# Altium PCB FMUM.PcbDoc (part 3 of 4)
Units mm, origin at the board's own origin, x right, y up, seen from the top; angles counter-clockwise.
Board outline 36 x 29 mm, 8 copper layers (Top Layer, GND1, Signal1, GND2, PWR1, Signal2, GND3, Bottom Layer), stack 1.01 mm thick; 117 components, 167 nets, 719 pads, 811 vias.
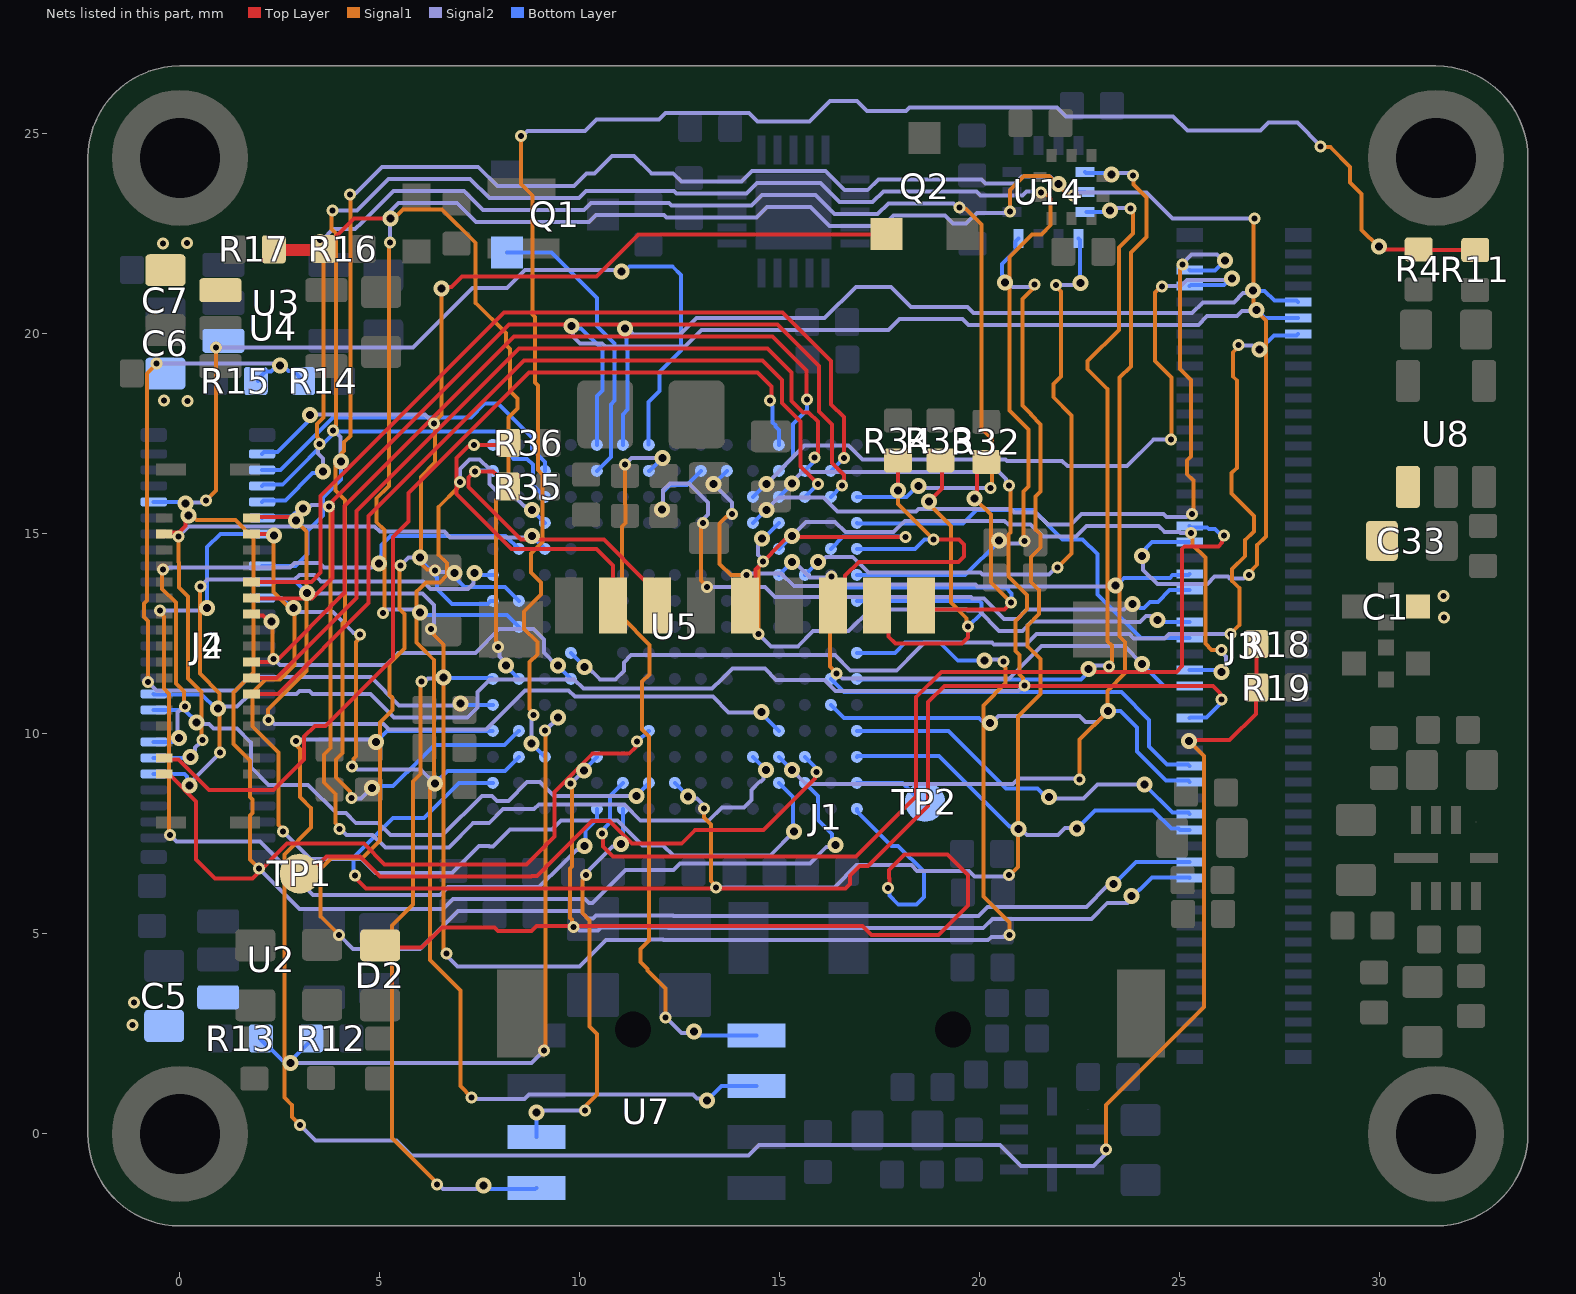
[diagram p9: the nets of this part, all layers, seen from the top]

## Via types
v1: diameter 0.3, hole 0.15, Top Layer to Bottom Layer, tented both sides, 279 vias
v2: diameter 0.3, hole 0.15, Signal1 to Signal2, tented both sides, 267 vias
v3: diameter 0.4, hole 0.2, Signal2 to Bottom Layer, tented both sides, 209 vias
v4: diameter 0.4, hole 0.2, Top Layer to Signal1, tented both sides, 54 vias
v5: diameter 0.3, hole 0.15, Top Layer to Bottom Layer, tented top, 2 vias

## Nets (pads, with @x,y where several pads share a name; then routed paths per layer and width w, separated by ;. In a path a pad name is that pad's centre, name@x,y a point inside that pad or via, vN(x,y) a via of type N, cw(c..) or ccw(c..) an arc to the next point about the centre after c; other vN are vias at no path point) (continued)
nLED_RED: D2.K U5.A1 | length 23.2
  Top Layer w0.1: D2.K@5.004,4.714 5.063,4.655 6.041,4.655 6.547,5.16 7.865,5.16 7.951,5.074 8.784,5.074 8.91,5.2 17.063,5.2 17.287,4.976 18.959,4.976 19.699,5.716 19.699,6.476 19.194,6.98 18.11,6.98 17.724,6.594 17.724,6.4 17.734,6.39 17.734,6.185 v1(17.698,6.149)
  Bottom Layer w0.1: U5.A1@16.923,8.127 16.923,8.072 17.007,7.988 17.007,7.986 17.792,7.201 17.956,7.201 18.599,6.558 18.599,5.927 18.412,5.741 17.958,5.741 17.736,5.963 17.736,6.111 v1(17.698,6.149)
nPOWER_IN_A: J3.89 U5.M7 | length 27.5
  Signal1 w0.1: v2(26.261,12.5) 26.484,12.722 26.484,13.646 26.3,13.829 26.3,14.118 26.633,14.451 26.633,14.843 26.852,15.062 26.852,15.452 26.289,16.015 26.289,16.52 26.421,16.652 26.421,18.842 26.321,18.942 26.321,19.531 26.47,19.68 v2(26.47,19.725)
  Signal2 w0.1: v3(10.111,11.673) 10.19,11.673 10.496,11.367 10.891,11.367 11.096,11.572 11.096,11.783 11.28,11.967 16.377,11.967 16.765,11.579 17.914,11.579 18.465,12.131 18.614,12.279 20.305,12.279 20.347,12.237 21.156,12.237 21.417,12.498 23.734,12.498 23.843,12.389 24.617,12.389 24.728,12.5 v2(26.261,12.5) ; v2(26.47,19.725) 26.479,19.715 26.812,19.715 26.914,19.613 v3(26.995,19.613)
  Bottom Layer w0.1: U5.M7@9.773,12.027 10.111,11.688 v3(10.111,11.673) ; v3(26.995,19.613) 27.348,19.965 27.92,19.965 J3.89@27.955,20
nPOWER_IN_B: J3.91 U5.L15 | length 22.5
  Signal2 w0.1: v3(9.788,20.194) 9.829,20.152 9.829,19.94 10.004,19.765 10.552,19.765 10.634,19.683 12.627,19.683 13.037,20.093 17.712,20.093 17.993,20.374 19.566,20.374 19.716,20.225 25.459,20.225 25.679,20.445 26.426,20.445 26.55,20.569 26.887,20.569 v3(26.913,20.595)
  Bottom Layer w0.1: v3(9.788,20.194) 9.841,20.14 10.029,20.14 10.559,19.61 10.559,19 10.559,18.584 10.423,18.448 U5.L15@10.423,17.227 ; v3(26.913,20.595) 26.926,20.595 27.122,20.399 J3.91@27.955,20.4 J3.91@27.955,20.4
nPOWER_IN_C: J3.93 U5.K15 | length 21
  Signal2 w0.1: v3(11.125,20.133) 11.184,20.133 11.334,19.983 12.503,19.983 12.913,20.393 16.12,20.393 16.903,21.176 17.778,21.176 18.28,20.674 19.691,20.674 19.84,20.525 25.307,20.525 25.573,20.791 26.348,20.791 26.583,21.026 26.772,21.026 v3(26.829,21.082)
  Bottom Layer w0.1: U5.K15@11.073,17.227 11.073,17.989 11.189,18.105 11.189,19 11.189,19.618 11.166,19.641 11.166,20.092 v3(11.125,20.133) ; v3(26.829,21.082) 26.832,21.079 27.12,21.079 27.364,20.835 27.92,20.835 J3.93@27.955,20.8
PG6: J4.44 U5.J15 | length 22.4
  Signal1 w0.1: v2(0.651,15.838) 0.9,16.087 v2(0.9,19.665)
  Signal2 w0.1: v3(0.144,15.758) 0.17,15.784 0.543,15.784 0.597,15.838 v2(0.651,15.838) ; v2(0.9,19.665) 5.829,19.665 7.316,21.151 8.183,21.151 8.632,21.6 10.996,21.6 v3(11.035,21.561)
  Bottom Layer w0.1: J4.44@-0.655,15.8 0.102,15.8 v3(0.144,15.758) ; v3(11.035,21.561) 11.116,21.561 11.235,21.68 12.32,21.68 12.532,21.468 12.532,19.586 11.989,19.043 11.989,18.568 11.718,18.297 U5.J15@11.718,17.232
SCALED_V5: R18.1 R19.2 U5.R4 | length 51.4
  Top Layer w0.1: v4(25.227,9.825) 25.246,9.844 26.244,9.844 26.897,10.497 26.897,10.899 26.936,10.939 26.913,10.963 R18.1@26.913,12.245
  Signal1 w0.1: v2(2.898,9.817) 2.937,9.779 2.937,9.683 2.998,9.621 2.998,8.427 3.283,8.142 3.283,7.664 2.609,6.991 2.609,0.912 2.805,0.717 2.805,0.422 2.998,0.228 v2(2.998,0.222) ; v2(23.149,-0.39) 23.149,0.724 25.6,3.174 25.6,9.452 v4(25.227,9.825)
  Signal2 w0.1: v2(2.898,9.817) 2.937,9.856 3.047,9.856 3.057,9.866 4.76,9.866 4.822,9.804 v3(4.904,9.804) ; v2(2.998,0.222) 3.385,-0.165 5.415,-0.165 5.791,-0.541 14.209,-0.541 14.473,-0.277 20.498,-0.277 21.022,-0.802 22.839,-0.802 23.111,-0.53 23.111,-0.429 v2(23.149,-0.39)
  Bottom Layer w0.1: v3(4.904,9.804) 5.179,10.079 6,10.079 U5.R4@7.821,10.079
SCALED_VDD_3V3_SENSORS1: R4.1 R11.2 U5.N3 | length 43.5
  Top Layer w0.1: v4(29.979,22.185) 30.06,22.185 30.133,22.113 R4.1@30.968,22.113 ; R4.1@30.969,22.111 30.982,22.098 R11.2@32.383,22.098
  Signal1 w0.1: v2(8.527,24.95) 8.527,23.751 8.815,23.463 8.815,20.49 8.88,20.424 8.88,19 8.88,18.78 8.947,18.713 8.947,16.596 9.068,16.474 9.068,14.793 8.782,14.507 8.782,14.039 9.032,13.789 9.032,13.483 8.605,13.056 8.605,12.627 8.934,12.298 8.934,11.989 8.738,11.793 8.738,10.626 8.842,10.522 v2(8.842,10.467) ; v2(28.515,24.682) 28.531,24.667 28.761,24.667 29.251,24.176 29.251,23.791 29.545,23.497 29.545,22.602 29.962,22.185 v4(29.979,22.185)
  Signal2 w0.1: v2(8.527,24.95) 8.558,24.95 8.686,25.078 10.126,25.078 10.412,25.364 11.983,25.364 12.137,25.518 14.232,25.518 14.44,25.31 15.74,25.31 16.252,25.822 16.928,25.822 17.178,25.572 18.151,25.572 18.243,25.664 21.926,25.664 22.154,25.437 24.832,25.437 25.188,25.081 27.011,25.081 27.211,25.281 27.936,25.281 28.515,24.702 v2(28.515,24.682) ; v3(8.791,9.758) 8.791,10.362 8.842,10.413 v2(8.842,10.467)
  Bottom Layer w0.1: v3(8.791,9.758) U5.N3@9.123,9.427
SCALED_VDD_3V3_SENSORS2: R12.1 R13.2 U5.N4 | length 17.2
  Signal1 w0.1: v2(9.104,2.088) 9.134,2.117 9.134,6.736 v2@9.134,10.081
  Signal2 w0.1: v3(2.767,1.773) 8.788,1.772 v2(9.104,2.088) ; v2(9.132,10.083) 9.447,10.399 v3(9.447,10.415)
  Bottom Layer w0.1: R13.2@2.024,2.388 2.024,2.351 2.272,2.103 2.298,2.103 2.57,1.831 2.709,1.831 v3@2.74,1.8 ; v3(2.767,1.773) 2.767,1.827 3.285,2.345 R12.1@3.285,2.388 ; U5.N4@9.123,10.077 9.447,10.401 v3(9.447,10.415)
SCALED_VDD_3V3_SENSORS3: R14.1 R15.2 U5.R5 | length 21.9
  Signal1 w0.1: v2(-0.801,11.3) -0.801,12.824 -0.901,12.924 -0.901,13.255 -0.824,13.333 -0.824,19.007 -0.585,19.246 v2(-0.585,19.265)
  Signal2 w0.1: v2(-0.801,11.3) v2(-0.801,11.3) -0.581,11.081 1.385,11.081 1.726,11.421 4.774,11.421 5.479,10.716 6,10.716 6.961,10.716 v3(7.01,10.765) ; v2(-0.585,19.265) 2.45,19.265 v3(2.5,19.215)
  Bottom Layer w0.1: R15.2@1.948,18.821 1.948,18.868 2.144,19.064 2.273,19.064 2.462,19.253 v3(2.5,19.215) 2.562,19.215 2.709,19.067 2.836,19.067 R14.1@3.081,18.821 ; v3(7.01,10.765) 7.049,10.727 U5.R5@7.823,10.727
SCALED_VDD_3V3_SENSORS4: R16.1 R17.2 U5.P6 | length 17.6
  Top Layer w0.1: R16.1@3.566,22.1 R16.1@3.589,22.123 4.348,22.882 v4(5.266,22.882)
  Top Layer w0.3: R17.2@2.346,22.1 R16.1@3.566,22.1
  Signal1 w0.1: v4(5.266,22.882) 5.347,22.882 5.574,23.11 6.555,23.11 7.395,22.269 7.395,20.778 8.148,20.026 8.148,19.725 8.248,19.624 8.248,19 8.248,18.574 8.441,18.381 8.441,18.133 8.218,17.911 8.218,16.161 7.908,15.85 7.908,12.328 7.913,12.323 7.913,12.208 v2(7.951,12.17)
  Signal2 w0.1: v2(7.951,12.17) 7.99,12.131 7.99,11.938 8.148,11.78 v3(8.148,11.715)
  Bottom Layer w0.1: v3(8.148,11.715) 8.148,11.702 U5.P6@8.473,11.377
SDMMC2_CLK: J1.5 U5.B11 | length 7.1
  Top Layer w0.1: J1.5@14.129,13.216 14.384,13.471 14.384,14.11 15.195,14.921 v1@18.145,14.921
  Bottom Layer w0.1: U5.B11@16.273,14.627 16.581,14.935 18.136,14.935 v1(18.145,14.927)
SDMMC2_CMD: J1.3 R34.1 U5.A11 | length 9.5
  Top Layer w0.1: J1.3@16.329,13.216 16.629,13.516 16.629,13.959 16.972,14.302 19.467,14.302 19.602,14.437 19.602,14.738 19.475,14.865 v1(18.835,14.865) ; v4(17.955,16.09) R34.1@17.955,16.835
  Signal1 w0.1: v4(17.955,16.09) 17.955,15.746 v1(18.835,14.865)
  Bottom Layer w0.1: U5.A11@16.923,14.627 18.377,14.627 18.465,14.715 18.613,14.863 18.833,14.863 v1(18.835,14.865)
SDMMC2_D0: J1.7 R35.1 U5.R14 | length 8.1
  Top Layer w0.1: v1(7.371,16.564) 7.214,16.405 7.214,16.172 8.521,14.864 10.596,14.864 11.595,13.866 11.629,13.866 11.636,13.859 11.636,13.509 J1.7@11.929,13.216 ; v1(7.371,16.564) 7.826,16.564 7.923,16.467 7.959,16.467 8.208,16.219 R35.1@8.208,16.183
  Bottom Layer w0.1: v1(7.371,16.564) 7.396,16.589 7.81,16.589 U5.R14@7.823,16.577
SDMMC2_D1: J1.8 R36.1 U5.R15 | length 8.5
  Top Layer w0.1: R36.1@8.221,17.062 8.058,17.225 v1(7.351,17.225) 7.312,17.187 7.203,17.187 6.917,16.901 6.917,15.994 8.284,14.627 10.41,14.627 10.829,14.208 J1.8@10.829,13.216
  Bottom Layer w0.1: v1(7.351,17.225) 7.352,17.224 7.82,17.224 U5.R15@7.823,17.227
SDMMC2_D2: J1.1 R32.1 U5.B9 | length 11.3
  Top Layer w0.1: J1.1@18.529,13.216 18.632,13.113 20.619,13.113 20.778,13.272 v1(20.778,13.283) ; v4(19.868,15.891) 19.923,15.946 19.923,16.566 R32.1@20.159,16.802
  Signal1 w0.1: v4(19.868,15.891) 20.274,15.485 20.274,13.786 v1(20.778,13.283)
  Bottom Layer w0.1: U5.B9@16.273,13.327 16.601,13.655 20.648,13.655 20.787,13.516 20.787,13.292 v1(20.778,13.283)
SDMMC2_D3: J1.2 R33.1 U5.A9 | length 11.9
  Top Layer w0.1: J1.2@17.429,13.216 17.708,12.936 17.708,12.433 17.886,12.255 19.546,12.255 19.702,12.411 v1(19.702,12.683) ; v4(18.727,15.806) 19.055,16.134 19.055,16.808 R33.1@19.085,16.837
  Signal1 w0.1: v4(18.727,15.806) 18.727,15.754 19.279,15.202 19.279,13.282 19.669,12.892 19.669,12.715 v1(19.702,12.683)
  Bottom Layer w0.1: U5.A9@16.923,13.327 19.976,13.327 20.034,13.268 20.034,13.015 v1(19.702,12.683)
SE050_EN: Q1.1 U5.L14 | length 7.4
  Bottom Layer w0.1: Q1.1@8.173,22.037 9.284,22.037 10.425,20.895 10.425,20.197 10.866,19.756 10.866,19 10.866,18.333 10.773,18.24 10.773,16.927 U5.L14@10.423,16.577
SENSORS_VDD_5V: C1.3 C5.2 C6.2 C7.2 C33.2 U2.1 U3.1 U4.1 U8.1
  other v1: -1.188,2.727 -1.144,3.286 31.603,12.913 31.592,13.454 -0.397,18.337 0.192,18.317 -0.422,22.26 0.18,22.269
SPI1_DRDY1_BMI330: U5.H2 U14.4 | length 28.9
  Signal1 w0.1: v2(13.1,8.137) 13.102,8.135 13.102,7.915 13.279,7.737 13.279,6.322 13.401,6.201 v2(13.401,6.159) ; v2(20.731,6.477) 20.747,6.477 20.948,6.678 20.948,10.437 21.514,11.003 21.514,11.873 21.196,12.191 21.196,12.711 21.478,12.993 21.478,13.592 21.272,13.797 21.272,14.419 21.514,14.66 21.514,14.992 21.393,15.113 21.393,15.937 21.514,16.058 21.514,17.739 21.272,17.98 21.272,17.994 21.061,18.205 21.061,20.87 21.367,21.176 v2(21.367,21.231)
  Signal2 w0.1: v3(12.698,8.438) 12.755,8.38 12.925,8.38 13.062,8.244 13.062,8.175 v2(13.1,8.137) ; v2(13.401,6.159) 16.359,6.159 16.918,6.718 18.289,6.718 18.429,6.577 19.726,6.577 19.865,6.439 20.693,6.439 v2(20.731,6.477) ; v3(20.628,21.282) 20.709,21.282 20.815,21.176 21.251,21.176 21.264,21.189 21.272,21.189 21.313,21.231 v2(21.367,21.231)
  Bottom Layer w0.1: U5.H2@12.373,8.777 12.707,8.442 12.707,8.438 v3(12.698,8.438) ; v3(20.628,21.282) 20.57,21.34 20.57,21.476 20.555,21.491 20.555,21.746 20.893,22.083 20.893,22.311 U14.4@20.968,22.386
SPI1_MISO_SENSOR1_BMI330: U5.C10 U14.1 | length 16.1
  Signal1 w0.1: v2(21.901,21.225) 21.901,21.19 22.024,21.066 22.024,18.938 21.835,18.748 21.835,18.417 22.289,17.963 22.289,14.508 v2(21.939,14.158)
  Signal2 w0.1: v3(15.948,14.302) 16.029,14.302 16.154,14.427 16.82,14.427 17.211,14.037 18.465,14.037 20.012,14.037 20.067,13.983 21.726,13.983 21.901,14.158 v2(21.939,14.158) ; v2@21.905,21.22 22.462,21.22 v3(22.516,21.275)
  Bottom Layer w0.1: U5.C10@15.623,13.977 v3(15.948,14.302) ; U14.1@22.468,22.386 22.503,22.351 22.503,21.288 v3(22.516,21.275)
SPI1_MOSI_SENSOR1_BMI330: U5.A6 U14.14 | length 19.9
  Signal1 w0.1: v2(23.228,11.684) 23.228,11.738 23.297,11.806 23.297,12.205 23.19,12.312 23.19,18.617 22.69,19.117 22.69,19.319 23.472,20.101 23.472,22.155 23.832,22.514 23.832,23.019 23.765,23.086 v2(23.765,23.14)
  Signal2 w0.1: v3(22.711,11.624) 22.792,11.624 22.88,11.712 23.199,11.712 v2(23.228,11.684) ; v3(23.251,23.09) 23.306,23.145 v2@23.76,23.145
  Bottom Layer w0.1: U5.A6@16.923,11.377 16.94,11.359 18.465,11.359 22.527,11.359 22.711,11.543 v3(22.711,11.624) ; U14.14@22.664,23.047 23.208,23.047 v3(23.251,23.09)
SPI1_nCS1_BMI330: U5.D3 U14.12 | length 25.2
  Signal1 w0.1: v2(22.494,8.861) 22.492,8.863 22.492,9.861 23.184,10.553 23.184,11.073 23.628,11.518 23.628,12.298 23.49,12.437 23.49,18.905 23.772,19.187 23.772,22.031 24.165,22.423 24.165,23.416 23.839,23.741 23.839,23.946 v2(23.83,23.956)
  Signal2 w0.1: v3(15.298,9.102) 15.646,8.753 15.787,8.753 15.789,8.752 16.037,8.752 16.039,8.753 18.465,8.753 20.832,8.753 20.961,8.883 22.472,8.883 v2(22.494,8.861) ; v3(23.296,23.99) 23.329,24.024 23.708,24.024 23.776,23.956 v2(23.83,23.956)
  Bottom Layer w0.1: U5.D3@14.973,9.427 v3(15.298,9.102) ; U14.12@22.631,24.048 22.65,24.028 23.258,24.028 v3(23.296,23.99)
SPI1_SCK_SENSOR1_BMI330: U5.P4 U14.13 | length 40.6
  Signal1 w0.1: v2(4.246,23.49) 4.262,23.474 4.262,17.45 4.104,17.292 4.104,17.068 3.89,16.853 3.89,16.09 4.128,15.851 4.128,12.818 4.067,12.756 4.067,9.528 3.899,9.361 3.899,8.913 4.249,8.563 4.249,8.433 v2(4.288,8.395)
  Signal2 w0.1: v2(4.246,23.49) 4.284,23.528 4.405,23.528 5.053,24.176 7.458,24.176 7.934,23.7 9.855,23.7 10.169,24.014 10.369,24.014 10.801,24.447 11.357,24.447 11.787,24.017 12.331,24.017 12.537,23.811 14.045,23.811 14.302,24.068 16.142,24.068 16.616,23.594 17.195,23.594 17.463,23.861 20.044,23.861 20.144,23.762 20.878,23.762 21.051,23.935 21.754,23.935 21.94,23.749 v3(21.962,23.749) ; v2(4.288,8.395) 4.302,8.381 4.526,8.381 v3(4.796,8.65)
  Bottom Layer w0.1: v3(4.796,8.65) 4.841,8.695 5.332,8.695 6,9.363 6.364,9.727 8.116,9.727 8.465,10.077 U5.P4@8.473,10.077 ; v3(21.962,23.749) 21.969,23.749 22.171,23.547 22.63,23.547 U14.13@22.631,23.548
SPI2_DRDY2_ISM330_INT2: J2.31 U5.D15 | length 24.1
  Top Layer w0.1: J2.31@-0.39,9.4 -0.355,9.365 -0.037,9.365 0.289,9.04 0.289,9.038 0.726,8.6 2.344,8.6 3.1,9.356 3.1,9.931 3.372,10.203 3.644,10.203 5.329,11.887 5.329,14.924 5.717,15.312 5.717,16.028 6,16.31 6.604,16.914 8.69,19 8.726,19.036 14.439,19.036 14.476,19 14.795,18.68 14.795,18.38 v1(14.757,18.341)
  Bottom Layer w0.1: v1(14.757,18.341) 14.795,18.303 14.795,18.207 14.82,18.183 14.82,17.786 14.888,17.717 14.888,17.684 14.973,17.599 U5.D15@14.973,17.227
SPI2_MISO_SENSOR2_ISM330: J2.22 U5.C14 | length 21.4
  Top Layer w0.1: J2.22@1.79,11.4 1.798,11.392 2.412,11.392 4.415,13.395 4.415,15.574 6.604,17.763 7.256,18.415 7.841,19 8.478,19.636 14.688,19.636 15.286,19.038 15.286,19 15.286,18.326 15.572,18.04 15.713,18.04 15.947,17.806 15.947,17.039 15.867,16.959 v1(15.867,16.905)
  Bottom Layer w0.1: U5.C14@15.623,16.577 15.623,16.58 15.829,16.786 15.829,16.866 v1(15.867,16.905)
SPI2_MOSI_SENSOR2_ISM330: J2.24 U5.C13 | length 21.6
  Top Layer w0.1: J2.24@1.79,11 2.447,11 4.715,13.268 4.715,15.449 6.604,17.339 7.68,18.415 8.265,19 8.602,19.336 14.563,19.336 14.9,19 15.057,18.843 15.057,18.272 15.519,17.81 15.519,16.684 v1(15.951,16.252)
  Bottom Layer w0.1: U5.C13@15.623,15.927 15.626,15.927 v1(15.951,16.252)
SPI2_nCS1_ISM330: J2.33 U5.J4 | length 16.7
  Top Layer w0.1: J2.33@-0.39,9 -0.325,8.935 -0.214,8.935 0.406,8.315 0.406,6.857 0.878,6.386 1.811,6.386 2.681,7.256 4.598,7.256 5.117,6.737 6,6.737 8.663,6.737 9.36,7.434 9.36,8.545 10.319,9.504 11.229,9.504 11.387,9.662 11.387,9.771 v1(11.425,9.809)
  Bottom Layer w0.1: v1(11.425,9.809) 11.442,9.809 11.709,10.077 U5.J4@11.723,10.077
SPI2_SCK_SENSOR2_ISM330: J2.20 U5.D14 | length 21.7
  Top Layer w0.1: J2.20@1.79,11.8 2.384,11.8 4.115,13.531 4.115,15.698 6.604,18.187 6.832,18.415 7.417,19 8.353,19.936 14.812,19.936 15.666,19.083 15.666,19 v1@15.666,18.37
  Bottom Layer w0.1: U5.D14@14.973,16.577 15.323,16.927 15.323,17.75 15.672,18.099 v1(15.672,18.364)
SPI3_DRDY1_BMI088_INT1_ACCEL: TP1.1 U5.C3 | length 15.5
  Top Layer w0.1: TP1.1@3.029,6.299 3.66,6.93 4.497,6.93 4.997,6.43 8.78,6.43 8.798,6.448 8.926,6.448 9.214,6.736 10.302,7.824 10.737,7.824 11.307,7.255 12.545,7.255 12.883,7.592 14.587,7.592 15.875,8.88 15.875,9.013 v1(15.913,9.052)
  Bottom Layer w0.1: U5.C3@15.623,9.427 15.875,9.174 15.875,9.09 v1(15.913,9.052)
SPI3_DRDY2_BMI088_INT3_GYRO: J2.3 U5.C2 | length 29
  Top Layer w0.1: J2.3@-0.39,15 -0.355,15.035 -0.019,15.035 0.144,15.198 0.144,15.302 0.161,15.319 0.161,15.4 v4(0.218,15.458)
  Signal1 w0.1: v4(0.218,15.458) 0.3,15.458 0.411,15.346 1.384,15.346 1.839,14.891 1.839,11.535 1.336,11.032 1.336,9.751 1.751,9.336 1.751,8.425 1.817,8.358 1.817,8.027 1.751,7.96 1.751,6.855 v2(1.974,6.632)
  Signal2 w0.1: v2(1.974,6.632) 2.987,5.619 6.574,5.619 6.827,5.872 10.132,5.872 10.228,5.777 10.311,5.777 11.134,6.6 12.345,6.6 12.504,6.759 15.749,6.759 16.158,7.169 16.339,7.169 v3(16.391,7.221)
  Bottom Layer w0.1: U5.C2@15.623,8.777 15.948,8.452 15.948,7.852 16.3,7.5 16.3,7.393 16.391,7.302 v3(16.391,7.221)
SPI3_MISO_SENSOR3_BMI088: J2.12 U5.B13 | length 22.2
  Top Layer w0.1: J2.12@1.79,13.4 1.799,13.391 3.307,13.391 3.815,13.899 3.815,15.822 6.993,19 8.229,20.236 14.936,20.236 15.972,19.201 15.972,18.415 15.972,18.064 16.298,17.738 16.298,16.777 16.598,16.477 16.598,16.368 16.594,16.363 16.594,16.248 v1(16.556,16.209)
  Bottom Layer w0.1: U5.B13@16.273,15.927 v1(16.556,16.209)
SPI3_MOSI_SENSOR3_BMI088: J2.14 U5.M6 | length 10.1
  Top Layer w0.1: J2.14@1.79,13 1.835,12.955 2.082,12.955 2.226,12.811 v4(2.291,12.811)
  Signal1 w0.1: v4(2.291,12.811) 2.31,12.792 2.31,11.902 v2(2.341,11.872)
  Signal2 w0.1: v2(2.341,11.872) 2.353,11.872 2.499,11.725 5.156,11.725 5.458,12.027 6,12.027 7.384,12.027 7.976,12.618 8.845,12.618 9.098,12.365 9.098,12.034 9.417,11.715 v3(9.448,11.715)
  Bottom Layer w0.1: v3(9.448,11.715) 9.448,11.702 U5.M6@9.773,11.377
SPI3_nCS1_BMI088_ACCEL: J2.2 U5.D4 | length 20.4
  Top Layer w0.1: J2.2@1.79,15.4 1.811,15.421 2.734,15.421 2.825,15.33 v4(2.906,15.33)
  Signal1 w0.1: v2(2.216,10.345) 2.2,10.361 2.2,10.606 3.166,11.572 3.166,15.055 2.906,15.315 v4(2.906,15.33)
  Signal2 w0.1: v2(2.216,10.345) 2.27,10.345 2.361,10.254 5.09,10.254 5.227,10.116 6,10.116 7.657,10.116 8.63,11.089 9.714,11.089 9.873,10.931 13.326,10.931 13.717,10.54 14.534,10.54 v3(14.543,10.549)
  Bottom Layer w0.1: v3(14.543,10.549) 14.543,10.506 U5.D4@14.973,10.077
SPI3_nCS2_BMI088_GYRO: J2.4 U5.D2 | length 24.9
  Top Layer w0.1: J2.4@1.79,15 2.309,15 v4(2.353,14.956)
  Signal1 w0.1: v4(2.353,14.956) 2.334,14.936 2.334,13.549 2.865,13.018 2.865,11.723 2.506,11.365 2.14,11.365 1.816,11.04 1.816,10.18 2.05,9.945 2.055,9.945 2.467,9.533 2.467,7.726 2.583,7.61 v2(2.583,7.556)
  Signal2 w0.1: v2(2.583,7.556) 3.263,6.876 4.541,6.876 4.891,6.526 6.803,6.526 7.014,6.736 7.478,7.2 7.726,7.2 7.745,7.181 7.827,7.181 8.251,7.605 9.302,7.605 9.529,7.833 10.944,7.833 11.563,7.214 12.083,7.214 12.338,6.959 14.758,6.959 v3(15.355,7.556)
  Bottom Layer w0.1: U5.D2@14.973,8.777 15.329,8.42 15.329,8.257 15.323,8.251 15.323,8.002 15.329,7.996 15.329,7.582 v3(15.355,7.556)
SPI3_SCK_SENSOR3_BMI088: J2.10 U5.B14 | length 21.9
  Top Layer w0.1: J2.10@1.79,13.8 3.284,13.8 3.515,14.03 3.515,15.946 6.568,19 8.105,20.536 15.06,20.536 16.278,19.319 16.278,19 16.278,18.241 16.598,17.921 v1(16.598,16.902)
  Bottom Layer w0.1: U5.B14@16.273,16.577 v1(16.598,16.902)
SPI4_DRDY1: J4.18 U5.J2 | length 15
  Signal2 w0.1: v3@0.413,10.287 0.456,10.244 0.726,10.244 0.834,10.136 1.423,10.136 1.771,9.788 1.771,9.175 2.218,8.728 3.206,8.728 3.915,8.018 4.153,8.018 4.396,7.776 4.958,7.776 5.264,7.469 6,7.469 6.567,7.469 7.549,8.451 7.797,8.451 7.928,8.32 8.209,8.32 8.682,8.793 9.005,8.793 9.346,8.452 v3@11.411,8.452
  Bottom Layer w0.1: J4.18@-0.655,10.6 0.12,10.6 0.413,10.307 v3(0.413,10.289) ; v3(11.411,8.452) 11.411,8.465 U5.J2@11.723,8.777
SPI4_MISO_SENSOR4: J4.12 U5.N11 | length 16.3
  Signal1 w0.1: v2(-0.035,14.94) -0.035,14.292 -0.024,14.281 -0.024,13.658 0.199,13.435 0.199,11.386 0.536,11.048 0.536,9.869 v2(0.561,9.844)
  Signal2 w0.1: v2(-0.035,14.94) 0.214,15.189 4.87,15.189 5.003,15.057 6,15.057 6.613,15.057 6.754,14.915 8.762,14.915 v3(8.798,14.952) ; v3(0.265,9.425) 0.265,9.474 0.378,9.587 0.378,9.657 0.498,9.776 0.498,9.781 v2(0.561,9.844)
  Bottom Layer w0.1: J4.12@-0.655,9.4 0.24,9.4 v3(0.265,9.425) ; v3(8.798,14.952) U5.N11@9.123,14.627
SPI4_MOSI_SENSOR4: J4.14 U5.P11 | length 15
  Signal1 w0.1: v2(-0.424,14.115) -0.448,14.091 -0.448,13.627 -0.101,13.281 -0.101,11.262 0.098,11.062 0.098,10.715 v2(0.132,10.681)
  Signal2 w0.1: v2(-0.424,14.115) -0.386,14.154 -0.277,14.154 -0.265,14.166 2.754,14.166 2.864,14.277 3.486,14.277 3.596,14.166 4.794,14.166 4.891,14.263 v3(4.972,14.263) ; v3(-0.027,9.894) -0.064,9.931 -0.064,10.536 0.08,10.681 v2(0.132,10.681)
  Bottom Layer w0.1: J4.14@-0.655,9.8 -0.202,9.8 -0.108,9.894 v3(-0.027,9.894) ; v3(4.972,14.263) 5.029,14.32 5.029,14.466 5.035,14.471 5.035,14.727 5.262,14.954 6.604,14.954 8.145,14.954 U5.P11@8.473,14.627
SPI4_nCS1: J4.20 U5.D13 | length 35.3
  Signal1 w0.1: v2(20.724,16.216) 20.762,16.177 20.762,16.059 20.763,16.057 20.763,15.041 20.714,14.992 20.714,14.285 20.714,13.931 21.178,13.468 21.178,13.117 20.888,12.828 20.888,12.074 20.987,11.975 20.987,11.485 21.078,11.394 21.078,11.242 v2(21.114,11.205)
  Signal2 w0.1: v3(0.956,10.631) 1.009,10.684 1.43,10.684 1.746,11 2.915,11 2.993,11.078 3.241,11.078 3.32,11 4.768,11 5.352,10.416 6,10.416 6.253,10.416 6.254,10.415 7.185,10.415 7.435,10.665 7.435,11.046 7.755,11.365 9.853,11.365 10.087,11.131 13.305,11.131 13.551,11.377 13.554,11.377 13.811,11.633 14.621,11.633 14.901,11.354 16.11,11.354 16.389,11.074 20.955,11.074 21.086,11.205 v2(21.114,11.205) ; v3(15.298,16.265) 15.298,16.294 15.556,16.552 18.465,16.552 20.475,16.552 20.656,16.372 20.656,16.338 20.724,16.27 v2(20.724,16.216)
  Bottom Layer w0.1: J4.20@-0.655,11 -0.642,10.987 0.541,10.987 0.897,10.631 v3(0.956,10.631) ; U5.D13@14.973,15.927 15.298,16.252 v3(15.298,16.265)
SPI4_SCK_SENSOR4: J4.10 U5.R10 | length 14.5
  Signal1 w0.1: v2(0.516,13.684) 0.499,13.667 0.499,11.51 0.995,11.014 v2@0.995,9.539
  Signal2 w0.1: v3(0.238,8.708) 0.238,8.762 0.999,9.523 v2(0.999,9.535) ; v2(0.516,13.684) 0.69,13.858 2.87,13.858 2.989,13.977 3.361,13.977 3.533,13.805 6,13.805 6.087,13.805 6.269,13.623 7.199,13.623 7.337,13.762 7.337,13.997 v3(7.367,14.027)
  Bottom Layer w0.1: J4.10@-0.655,9 0.118,9 0.18,8.937 0.18,8.765 v3(0.238,8.708) ; v3(7.367,14.027) 7.417,13.977 U5.R10@7.823,13.977
SPI5_MISO_FRAM: U5.N12 U7.2 | length 27.7
  Signal1 w0.1: v2(7,16.3) 7,16.246 6.934,16.179 6.934,16.142 6.471,15.679 6.471,14.476 6.678,14.269 6.678,13.967 6.503,13.791 6.15,13.791 6,13.641 5.919,13.56 5.919,12.281 6,12.2 6.346,11.854 6.346,8.746 6.253,8.653 6.253,6.736 6.253,4.347 7.013,3.587 7.013,1.195 v2(7.293,0.915)
  Signal2 w0.1: v2(7,16.3) 7,16.623 7.241,16.864 7.495,16.864 7.741,16.618 7.741,16.25 8.041,15.951 8.356,15.951 8.604,15.703 8.615,15.703 8.717,15.602 v3(8.798,15.602) ; v2(7.293,0.915) 7.331,0.877 7.446,0.877 7.452,0.871 8.618,0.871 8.729,0.982 12.827,0.982 12.929,0.88 13.141,0.88 v3(13.183,0.838)
  Bottom Layer w0.1: v3(8.798,15.602) U5.N12@9.123,15.277 ; v3(13.183,0.838) 13.538,1.194 U7.2@14.409,1.194
SPI5_MOSI_FRAM: U5.R6 U7.5 | length 17.8
  Signal1 w0.1: v2(6.042,11.31) 6.02,11.288 6.02,9.004 5.829,8.813 5.829,5.737 5.3,5.208 5.3,-0.098 6.426,-1.224 v2(6.426,-1.27)
  Signal2 w0.1: v2(6.042,11.31) 6.08,11.348 6.163,11.348 6.202,11.388 6.575,11.388 v3(6.595,11.408) ; v2(6.426,-1.27) 6.48,-1.27 6.582,-1.372 7.431,-1.372 7.507,-1.295 v3(7.588,-1.295)
  Bottom Layer w0.1: v3(6.595,11.408) 6.609,11.393 7.806,11.393 U5.R6@7.823,11.377 ; v3(7.588,-1.295) 7.669,-1.295 7.746,-1.372 8.883,-1.372 U7.5@8.909,-1.346
SPI5_nCS1_FRAM: U5.J14 U7.1 | length 18.6
  Signal1 w0.1: v2(11.125,16.739) 11.125,15.742 11.139,15.728 11.139,15.272 11.049,15.182 11.049,12.919 11.74,12.228 11.74,11.543 11.74,11.491 11.555,11.307 11.555,10.105 11.725,9.935 11.725,4.837 11.513,4.624 11.513,4.293 11.688,4.118 11.688,4.089 12.144,3.632 v2(12.144,2.915)
  Signal2 w0.1: v2(11.125,16.739) 11.288,16.902 v3(12.061,16.902) ; v2@12.149,2.915 12.545,2.519 12.809,2.519 v3(12.846,2.557)
  Bottom Layer w0.1: U5.J14@11.723,16.577 11.736,16.577 v3(12.061,16.902) ; v3(12.846,2.557) 12.927,2.557 13.021,2.464 U7.1@14.409,2.464
SPI5_SCK_FRAM: U5.K1 U7.6 | length 10.2
  Signal1 w0.1: v2(10.129,0.582) 10.167,0.62 10.167,0.721 10.43,0.984 10.43,2.501 10.243,2.689 10.243,5.338 10.062,5.518 10.062,6.33 10.152,6.42 v2(10.152,6.474)
  Signal2 w0.1: v3(8.915,0.532) 8.973,0.589 10.121,0.589 v2(10.129,0.582) ; v2(10.152,6.474) 10.152,6.526 10.362,6.736 10.811,7.185 10.975,7.185 v3(11.032,7.243)
  Bottom Layer w0.1: U7.6@8.909,-0.076 8.915,-0.07 v3(8.915,0.532) ; v3(11.032,7.243) 11.073,7.283 U5.K1@11.073,8.127
SPI6_DRDY1_EXTERNAL1: J4.47 U5.N14 | length 8.7
  Bottom Layer w0.1: J4.47@2.055,16.6 2.515,16.6 3.832,17.916 6.604,17.916 7.279,17.916 7.618,18.255 7.953,18.255 8.8,17.408 8.8,17.125 9.123,16.802 U5.N14@9.123,16.577
SPI6_DRDY2_EXTERNAL1: J4.45 U5.N13 | length 8.7
  Bottom Layer w0.1: J4.45@2.055,16.2 2.084,16.229 2.569,16.229 3.895,17.555 6.604,17.555 7.918,17.555 8.123,17.351 8.123,17.1 8.346,16.877 8.676,16.877 8.823,16.73 8.823,16.227 U5.N13@9.123,15.927
SPI6_MISO_EXTERNAL1: J4.31 U5.P3 | length 10.8
  Signal1 w0.1: v2(4.305,9.187) 4.339,9.221 4.339,9.376 4.398,9.436 4.398,12.297 4.437,12.336 4.437,12.367 4.506,12.437 v2(4.506,12.491)
  Signal2 w0.1: v3(2.84,13.144) 2.921,13.144 3.019,13.046 3.827,13.046 4.345,12.529 4.468,12.529 v2(4.506,12.491) ; v2(4.305,9.187) 4.359,9.187 4.441,9.104 6.031,9.104 v3(6.381,8.755)
  Bottom Layer w0.1: J4.31@2.055,13.4 2.535,13.4 2.791,13.144 v3(2.84,13.144) ; v3(6.381,8.755) 6.381,8.771 6.687,9.077 8.123,9.077 U5.P3@8.473,9.427
SPI6_MOSI_EXTERNAL1: J4.33 U5.A7 | length 39.4
  Signal1 w0.1: v2(6.273,12.627) 6.273,12.573 6.349,12.498 6.349,12.478 6.593,12.233 6.593,4.627 6.661,4.559 v2(6.661,4.505) ; v2(20.587,11.81) 20.625,11.772 20.625,11.668 20.642,11.651 20.642,11.27 20.084,10.712 20.084,5.939 20.738,5.284 v2(20.738,4.975)
  Signal2 w0.1: v3(3.175,13.527) 3.197,13.505 6.062,13.505 6.347,13.22 6.347,12.754 6.273,12.681 v2(6.273,12.627) ; v2(6.661,4.505) 6.661,4.464 6.935,4.19 9.987,4.19 10.646,4.849 11.737,4.849 11.747,4.859 12.078,4.859 12.088,4.849 20.207,4.849 20.285,4.926 20.58,4.926 20.59,4.937 20.7,4.937 v2(20.738,4.975) ; v3(20.118,11.829) 20.148,11.859 20.484,11.859 20.533,11.81 v2(20.587,11.81)
  Bottom Layer w0.1: J4.33@2.055,13.8 2.902,13.8 v3(3.175,13.527) ; U5.A7@16.923,12.027 17.874,12.027 18.127,12.279 18.465,12.279 19.007,12.279 19.457,11.829 v3(20.118,11.829)
SPI6_nCS1_EXTERNAL1: J4.41 U5.E3 | length 22.8
  Signal1 w0.1: v2(3.728,15.686) 3.767,15.647 3.767,9.652 3.598,9.484 3.598,8.79 3.888,8.501 3.888,7.772 3.988,7.672 v2(3.988,7.618)
  Signal2 w0.1: v3(3.079,15.639) 3.136,15.697 3.26,15.697 3.288,15.724 3.69,15.724 v2(3.728,15.686) ; v2(3.988,7.618) 4.026,7.618 4.169,7.476 4.818,7.476 5.134,7.159 6,7.159 6.722,7.159 7.329,7.767 7.723,7.767 8.076,8.12 8.857,8.12 8.974,8.237 11.111,8.237 11.518,7.83 13.217,7.83 13.55,8.163 14.101,8.163 14.291,8.353 14.291,8.603 14.496,8.808 14.529,8.808 14.59,8.87 14.59,9.044 v3(14.648,9.102)
  Bottom Layer w0.1: J4.41@2.055,15.4 2.09,15.435 2.794,15.435 2.998,15.639 v3(3.079,15.639) ; U5.E3@14.323,9.427 v3(14.648,9.102)
SPI6_nCS2_EXTERNAL1: J4.43 U5.A13 | length 36
  Signal1 w0.1: v2(3.489,17.251) 3.45,17.29 3.45,17.397 3.429,17.418 3.429,17.749 3.594,17.913 3.594,22.202 3.505,22.29 v2(3.505,22.344) ; v2(19.491,23.161) 19.529,23.123 19.648,23.123 20.039,22.732 20.039,17.639 20.307,17.371 20.307,16.19 v2(20.269,16.152)
  Signal2 w0.1: v2(3.489,17.251) 3.454,17.217 3.454,17.01 3.579,16.886 3.579,16.563 v3(3.575,16.56) ; v2(3.505,22.344) 3.56,22.344 3.832,22.617 4.376,22.617 4.547,22.788 4.55,22.788 5.338,23.576 7.098,23.576 7.574,23.1 10.103,23.1 10.28,23.277 12.222,23.277 12.289,23.211 14.293,23.211 14.55,23.468 15.894,23.468 16.367,22.994 17.444,22.994 17.711,23.261 19.337,23.261 19.437,23.161 v2(19.491,23.161) ; v3(18.465,16.202) 18.515,16.152 v2(20.269,16.152)
  Bottom Layer w0.1: J4.43@2.055,15.8 2.09,15.835 2.635,15.835 3.319,16.519 3.534,16.519 v3(3.575,16.56) ; U5.A13@16.923,15.927 18.161,15.927 18.437,16.202 v3(18.465,16.202)
SPI6_nRESET_EXTERNAL1: J4.39 U5.L1 | length 22.5
  Signal1 w0.1: v2(-0.501,13.089) -0.501,13.035 -0.401,12.935 -0.401,11.137 -0.268,11.003 -0.268,7.489 v2(-0.247,7.468)
  Signal2 w0.1: v2(-0.501,13.089) 0.536,13.089 0.6,13.153 v3(0.681,13.153) ; v2(-0.247,7.468) -0.088,7.309 1.997,7.309 3.33,5.976 6.507,5.976 6.703,6.172 8.982,6.172 9.547,6.736 9.9,7.09 9.902,7.09 9.912,7.101 9.941,7.101 10.034,7.193 v3(10.115,7.193)
  Bottom Layer w0.1: v3(0.681,13.153) 0.681,14.671 1.01,15 J4.39@2.055,15 ; v3(10.115,7.193) 10.141,7.219 10.141,7.587 10.423,7.869 U5.L1@10.423,8.127
SPI6_SCK_EXTERNAL1: J4.35 U5.A10 | length 43.5
  Signal1 w0.1: v2(3.82,23.085) 3.787,23.052 3.787,22.628 3.908,22.507 3.908,17.716 3.829,17.637 v2(3.829,17.583) ; v2(21.114,14.826) 21.093,14.847 21.093,16.061 21.214,16.182 21.214,17.615 20.737,18.091 20.737,21.92 21.305,22.488 21.536,22.488 21.771,22.722 21.771,23.383 21.656,23.497 21.563,23.497 v2(21.525,23.535)
  Signal2 w0.1: v2(3.82,23.085) 3.823,23.088 4.425,23.088 5.214,23.876 7.257,23.876 7.734,23.4 9.979,23.4 10.156,23.577 12.347,23.577 12.413,23.511 14.169,23.511 14.426,23.768 16.018,23.768 16.491,23.294 17.32,23.294 17.587,23.561 19.92,23.561 20.02,23.462 21.061,23.462 21.161,23.562 21.498,23.562 v2(21.525,23.535) ; v2(3.829,17.583) 3.861,17.583 4.016,17.428 4.016,16.829 v3(4.029,16.816) ; v3(20.477,14.832) 20.534,14.774 20.621,14.774 20.629,14.766 21,14.766 21.06,14.826 v2(21.114,14.826)
  Bottom Layer w0.1: J4.35@2.055,14.2 2.89,14.2 3.188,14.498 3.188,15.075 3.578,15.465 3.578,15.907 4.025,16.355 4.025,16.813 v3(4.029,16.816) ; U5.A10@16.923,13.977 16.929,13.97 18.161,13.97 18.465,13.97 19.632,13.97 20.477,14.815 v3(20.477,14.832)
SPIX_SYNC: J4.49 Q2.1 U5.P9 | length 26.5
  Top Layer w0.1: v4(6.537,21.135) 6.578,21.177 6.79,21.177 7.05,21.436 10.415,21.436 11.469,22.49 Q2.1@17.666,22.49
  Signal1 w0.1: v2(6.35,17.755) 6.377,17.727 6.377,16.782 6.024,16.428 6.024,14.259 6.172,14.11 6.36,14.11 v2(6.378,14.091) ; v2@6.35,17.786 6.534,17.97 6.534,19.901 6.542,19.909 6.542,21.131 v4(6.537,21.135)
  Signal2 w0.1: v3(3.257,17.978) 3.262,17.983 6.121,17.983 v2(6.35,17.755) ; v2@6.387,14.091 6.425,14.053 6.527,14.053 6.537,14.044 6.842,14.044 v3(6.867,14.018)
  Bottom Layer w0.1: J4.49@2.055,17 2.105,17.05 2.437,17.05 3.199,17.812 3.199,17.92 v3(3.257,17.978) ; v3(6.867,14.018) 6.867,13.937 6.968,13.837 6.968,13.823 7.114,13.677 8.123,13.677 U5.P9@8.473,13.327
TRACECLK: TP2.1 U5.A2 | length 1.9
  Bottom Layer w0.1: U5.A2@16.923,8.777 18.064,8.777 18.465,8.376 18.54,8.301 TP2.1@18.626,8.301
UART4_RX: J3.96 U5.E13 | length 18.5
  Signal1 w0.1: v2(24.554,21.191) 24.531,21.191 24.372,21.032 24.372,19.324 24.788,18.909 24.788,17.383 v2(24.771,17.366)
  Signal2 w0.1: v3(14.661,16.252) 15.615,17.205 16.719,17.205 17.06,16.864 18.465,16.864 20.636,16.864 20.672,16.827 22.058,16.827 22.184,16.702 23.681,16.702 24.345,17.366 v2(24.771,17.366) ; v2@24.556,21.193 25.028,21.193 25.178,21.342 26.263,21.342 v3(26.306,21.386)
  Bottom Layer w0.1: U5.E13@14.323,15.927 14.648,16.252 v3(14.661,16.252) ; J3.96@25.245,21.2 25.272,21.227 26.098,21.227 26.256,21.386 v3(26.306,21.386)
UART4_TX: J3.98 U5.E12 | length 20.5
  Signal1 w0.1: 24.997,19.558 24.997,19.124 25.272,18.848 25.272,16.937 25.171,16.835 25.171,16.504 25.34,16.334 25.34,15.662 25.334,15.656 25.334,15.542 v2(25.296,15.503) ; 24.997,19.559 24.997,19.89 24.997,21.614 25.065,21.682 v2(25.065,21.736)
  Signal2 w0.1: v3(14.661,15.602) 14.97,15.91 16.094,15.91 16.44,15.564 18.402,15.564 18.465,15.627 20.761,15.627 20.852,15.536 21.394,15.536 21.698,15.232 22.274,15.232 22.542,15.499 24.589,15.499 24.663,15.425 25.164,15.425 25.242,15.503 v2(25.296,15.503) ; v2(25.065,21.736) 25.065,21.762 25.291,21.988 25.926,21.988 26.076,21.838 v3(26.122,21.838)
  Bottom Layer w0.1: U5.E12@14.323,15.277 14.648,15.602 v3(14.661,15.602) ; J3.98@25.245,21.6 25.258,21.587 25.871,21.587 v3(26.122,21.838)
UART5_CTS_TELEM2: J3.60 U5.F14 | length 15.1
  Signal1 w0.1: v2(13.796,15.497) 13.742,15.497 13.663,15.418 13.651,15.418 13.494,15.261 13.494,14.249 13.773,13.971 v2(14.16,13.97) v2(14.16,13.97)
  Signal2 w0.1: v3(13.341,16.245) 13.796,15.789 v2(13.796,15.497) ; v2(14.16,13.97) 14.199,14.008 14.307,14.008 14.315,14.016 15.031,14.016 15.346,13.701 16.1,13.701 16.171,13.63 16.42,13.63 16.523,13.733 18.465,13.733 19.892,13.733 19.943,13.683 23.359,13.683 v3(23.391,13.714)
  Bottom Layer w0.1: v3(13.341,16.245) U5.F14@13.673,16.577 ; v3(23.391,13.714) 23.413,13.714 23.599,13.9 24.746,13.9 24.816,13.97 25.215,13.97 J3.60@25.245,14
UART5_RTS_TELEM2: J3.58 U5.G14 | length 18.5
  Signal1 w0.1: v2(13.077,15.267) 13.077,15.213 13.027,15.163 13.027,13.83 13.175,13.683 v2(13.175,13.672)
  Signal2 w0.1: v3(12.048,15.615) 12.079,15.647 12.079,16.094 12.25,16.265 12.728,16.265 13.205,15.788 13.205,15.488 13.116,15.398 13.116,15.305 v2(13.077,15.267) ; v2@13.177,13.67 14.63,13.67 14.872,13.428 18.465,13.428 19.773,13.428 19.818,13.383 20.102,13.383 20.607,12.877 20.938,12.877 21.17,13.109 23.606,13.109 23.749,13.252 v3(23.815,13.252)
  Bottom Layer w0.1: v3(12.048,15.615) 12.073,15.64 12.073,16.051 12.248,16.227 12.681,16.227 13.023,16.568 U5.G14@13.023,16.577 ; v3(23.815,13.252) 23.896,13.252 23.996,13.151 24.106,13.151 24.257,13.302 24.448,13.302 24.745,13.6 J3.58@25.245,13.6
UART5_RX_TELEM2: J3.54 U5.D12 | length 14.8
  Signal1 w0.1: v2@14.46,12.502 14.46,14.157 14.573,14.27 v2(14.573,14.316)
  Signal2 w0.1: v2(14.466,12.496) 14.778,12.184 15.446,12.184 15.829,12.567 16.711,12.567 17.259,13.115 18.465,13.115 19.661,13.115 19.694,13.083 19.977,13.083 20.482,12.577 21.062,12.577 21.294,12.809 23.621,12.809 23.628,12.802 24.001,12.802 24.152,12.953 24.262,12.953 24.362,12.852 v3(24.444,12.852) ; v3(14.555,14.891) 14.555,14.81 14.458,14.713 14.458,14.475 14.573,14.36 v2(14.573,14.316)
  Bottom Layer w0.1: v3(14.555,14.891) 14.587,14.891 U5.D12@14.973,15.277 ; v3(24.444,12.852) 24.492,12.804 J3.54@25.241,12.804
UART5_TX_TELEM2: J3.52 U5.A12 | length 10.4
  Bottom Layer w0.1: U5.A12@16.923,15.277 16.934,15.266 18.465,15.266 19.579,15.266 19.913,15.599 21.075,15.599 21.081,15.593 21.338,15.593 22.065,14.866 22.568,14.866 22.941,14.493 22.941,13.489 24.028,12.402 J3.52@25.243,12.402
UART7_CTS_TELEM1: J3.24 U5.R9 | length 36.5
  Signal1 w0.1: v2(3.983,4.968) 3.509,5.442 3.509,6.618 3.794,6.903 4.567,6.903 5.005,7.34 5.005,10.281 5.317,10.594 5.317,10.901 5.298,10.92 5.298,10.921 5.245,10.975 5.245,11.765 5.619,12.14 5.619,12.999 5.49,13.128 5.49,14.186 v2(5.509,14.205)
  Signal2 w0.1: v2(3.983,4.968) 4.323,4.628 6.007,4.628 6.951,5.572 10.008,5.572 10.198,5.382 10.33,5.382 10.407,5.459 12.327,5.459 12.336,5.449 19.959,5.449 20.185,5.675 22.665,5.675 23.182,6.193 23.284,6.193 v3(23.341,6.25) ; v2(5.509,14.205) 5.509,14.216 5.709,14.416 5.988,14.416 v3(6,14.404)
  Bottom Layer w0.1: v3(6,14.404) 6,14.346 6.432,13.914 6.432,13.621 6.8,13.253 7.695,13.253 7.769,13.327 U5.R9@7.823,13.327 ; v3(23.341,6.25) 23.355,6.25 23.905,6.8 J3.24@25.245,6.8
UART7_RTS_TELEM1: J3.22 U5.L3 | length 20.7
  Signal1 w0.1: v2(9.768,8.758) 9.802,8.724 9.802,6.736 9.802,6.69 9.752,6.64 9.752,5.404 9.801,5.355 9.801,5.332 9.804,5.328 9.804,5.21 v2(9.843,5.172)
  Signal2 w0.1: v2(9.768,8.758) 9.775,8.758 10.098,9.081 v3(10.098,9.088) ; v2(9.843,5.172) 9.897,5.172 9.987,5.082 10.455,5.082 10.532,5.159 12.203,5.159 12.212,5.149 20.083,5.149 20.309,5.375 22.789,5.375 23.183,5.77 23.688,5.77 23.688,5.774 23.785,5.871 v3(23.785,5.952)
  Bottom Layer w0.1: v3(10.098,9.088) 10.098,9.094 10.423,9.419 U5.L3@10.423,9.427 ; v3(23.785,5.952) 23.838,5.952 23.994,6.107 23.999,6.107 24.301,6.409 25.236,6.409 J3.22@25.245,6.4
UART7_RX_TELEM1: J3.66 U5.K2 | length 25
  Top Layer w0.1: v1(10.547,7.512) 10.579,7.48 10.579,7.182 10.827,6.934 16.902,6.934 18.407,8.439 18.407,10.917 19.039,11.549 24.911,11.549 25.056,11.693 25.056,14.629 25.114,14.688 25.964,14.688 26.058,14.781 26.058,14.918 v1(26.096,14.956)
  Bottom Layer w0.1: v1(10.547,7.512) 10.547,7.566 10.622,7.641 10.622,7.661 10.748,7.787 10.748,8.452 U5.K2@11.073,8.777 ; J3.66@25.245,15.2 25.28,15.165 25.679,15.165 25.724,15.12 25.873,15.12 25.998,14.995 26.058,14.995 v1(26.096,14.956)
UART7_TX_TELEM1: J3.64 U5.P8 | length 51.6
  Signal1 w0.1: v2(5.076,13.021) 5.109,13.054 5.109,15.102 4.908,15.303 4.908,15.885 5.225,16.201 5.225,22.257 v2(5.248,22.28) ; v2(20.75,23.062) 20.75,23.596 21.098,23.944 21.733,23.944 22.184,23.493 22.291,23.493 v2(22.329,23.455) ; v2(26.723,13.972) 26.723,14.026 26.933,14.236 26.933,14.719 27.152,14.938 27.152,20.34 26.845,20.647 26.845,22.874 v2(26.86,22.889)
  Signal2 w0.1: v2(5.076,13.021) 5.164,13.11 5.845,13.11 5.916,13.039 v3(5.997,13.039) ; v2(5.248,22.28) 5.248,23.062 5.462,23.276 6.927,23.276 7.403,22.8 10.227,22.8 10.404,22.977 12.098,22.977 12.164,22.911 14.418,22.911 14.674,23.168 15.769,23.168 16.243,22.694 17.568,22.694 17.835,22.961 19.126,22.961 19.326,22.762 19.657,22.762 19.923,23.028 20.71,23.028 20.745,23.062 v2(20.75,23.062) ; v2@22.332,23.452 22.38,23.452 22.468,23.54 24.167,23.54 24.819,22.888 v2(26.86,22.889) ; v3(24.053,14.449) 24.082,14.42 24.082,14.103 24.439,13.746 25.685,13.746 25.868,13.93 26.199,13.93 26.24,13.89 26.586,13.89 26.669,13.972 v2(26.723,13.972)
  Bottom Layer w0.1: v3(5.997,13.039) 6.054,12.982 6.178,12.982 6.183,12.977 8.173,12.977 U5.P8@8.473,12.677 ; v3(24.053,14.449) 24.053,14.53 24.151,14.628 24.151,14.649 24.302,14.8 J3.64@25.245,14.8
UART8_RX_GPS2: J3.30 U5.A4 | length 9.5
  Signal2 w0.1: v3(21.725,8.427) 21.771,8.382 22.586,8.382 22.945,8.741 v3(24.108,8.741)
  Bottom Layer w0.1: U5.A4@16.923,10.077 18.161,10.077 18.465,10.077 19.217,10.077 20.657,8.636 21.435,8.636 21.644,8.427 v3(21.725,8.427) ; v3(24.108,8.741) 24.108,8.738 24.811,8.035 25.21,8.035 J3.30@25.245,8
UART8_TX_GPS2: J3.28 U5.A3 | length 9.6
  Signal2 w0.1: v3(20.969,7.627) 21.028,7.627 21.178,7.477 21.953,7.477 22.13,7.654 22.399,7.654 v3(22.421,7.632)
  Bottom Layer w0.1: U5.A3@16.923,9.427 16.945,9.449 18.161,9.449 18.465,9.449 18.973,9.449 20.738,7.685 20.912,7.685 v3(20.969,7.627) ; v3(22.421,7.632) 22.879,8.09 24.332,8.09 24.787,7.635 24.965,7.635 25,7.6 J3.28@25.245,7.6
USART1_RX_GPS1: J3.34 U5.B5 | length 10.5
  Signal2 w0.1: v3(20.255,10.269) 20.281,10.269 20.464,10.452 22.485,10.452 22.634,10.303 22.934,10.303 23.2,10.569 v3(23.208,10.569)
  Bottom Layer w0.1: U5.B5@16.273,10.727 16.598,10.402 19.976,10.402 20.051,10.326 20.198,10.326 v3(20.255,10.269) ; v3(23.208,10.569) 23.52,10.569 23.928,10.16 23.928,9.557 24.651,8.835 25.21,8.835 J3.34@25.245,8.8
USART1_TX_GPS1: J3.36 U5.B6 | length 10.3
  Bottom Layer w0.1: U5.B6@16.273,11.368 16.597,11.043 18.465,11.043 23.537,11.043 24.228,10.353 24.228,9.681 24.675,9.235 25.204,9.235 J3.36@25.239,9.2
USART2_CTS_TELEM3: J3.48 U5.D11 | length 16
  Signal1 w0.1: v2(25.279,15.023) 25.318,14.985 25.318,14.725 25.634,14.409 25.634,12.255 25.788,12.1 v2@26.038,12.1
  Signal2 w0.1: v3(15.298,14.952) 15.648,15.302 16.382,15.302 16.64,15.044 17.837,15.044 18.121,15.327 18.465,15.327 20.618,15.327 20.709,15.236 21.27,15.236 21.574,14.932 22.399,14.932 22.666,15.199 24.465,15.199 24.621,15.044 24.992,15.044 25.009,15.027 v2@25.276,15.027 ; v3(26.038,11.547) 26.038,11.629 26.146,11.736 26.146,11.941 26.038,12.049 v2(26.038,12.1)
  Bottom Layer w0.1: U5.D11@14.973,14.627 v3(15.298,14.952) ; J3.48@25.245,11.6 25.986,11.6 v3(26.038,11.547)
USART2_RTS_TELEM3: J3.46 U5.D10 | length 13.8
  Signal1 w0.1: v2(16.296,13.93) 16.257,13.892 16.257,13.775 16.253,13.771 16.253,12.04 16.253,11.689 16.411,11.531 v2(16.411,11.509)
  Signal2 w0.1: v3(15.298,14.302) 15.36,14.302 15.752,13.91 16.276,13.91 v2(16.296,13.93) ; v2(16.411,11.509) 16.439,11.509 16.569,11.379 20.722,11.379 21.287,11.944 21.541,12.198 23.61,12.198 v3(24.056,11.751)
  Bottom Layer w0.1: U5.D10@14.973,13.977 v3(15.298,14.302) ; v3(24.056,11.751) 24.607,11.201 25.243,11.201 J3.46@25.245,11.2
USART2_RX_TELEM3: J3.42 U5.R2 | length 31.5
  Top Layer w0.1: v1(4.381,6.464) 4.381,6.41 4.464,6.327 4.464,6.322 4.656,6.13 16.634,6.13 16.758,6.253 16.758,6.459 16.992,6.694 17.198,6.694 17.24,6.736 18.465,7.961 18.707,8.203 18.707,10.793 19.114,11.2 25.831,11.2 26.003,11.028 26.003,10.893 v1(26.041,10.854)
  Bottom Layer w0.1: v1(4.381,6.464) 4.343,6.502 4.343,6.617 4.337,6.622 4.337,6.907 5.331,7.9 6,7.9 6.1,7.9 6.977,8.777 U5.R2@7.823,8.777 ; J3.42@25.245,10.4 25.258,10.413 25.666,10.413 26.003,10.75 26.003,10.816 v1(26.041,10.854)